# Altium PCB Crabit_V2.PcbDoc (part 2 of 2)
Units mil, origin at the board's own origin, x right, y up, seen from the top; angles counter-clockwise.
Board outline 1492.69 x 1472.87 mil, 4 copper layers (Top Layer, GND, PWR, Bottom Layer), stack 75.156 mil thick; 108 components, 88 nets, 475 pads, 227 vias.
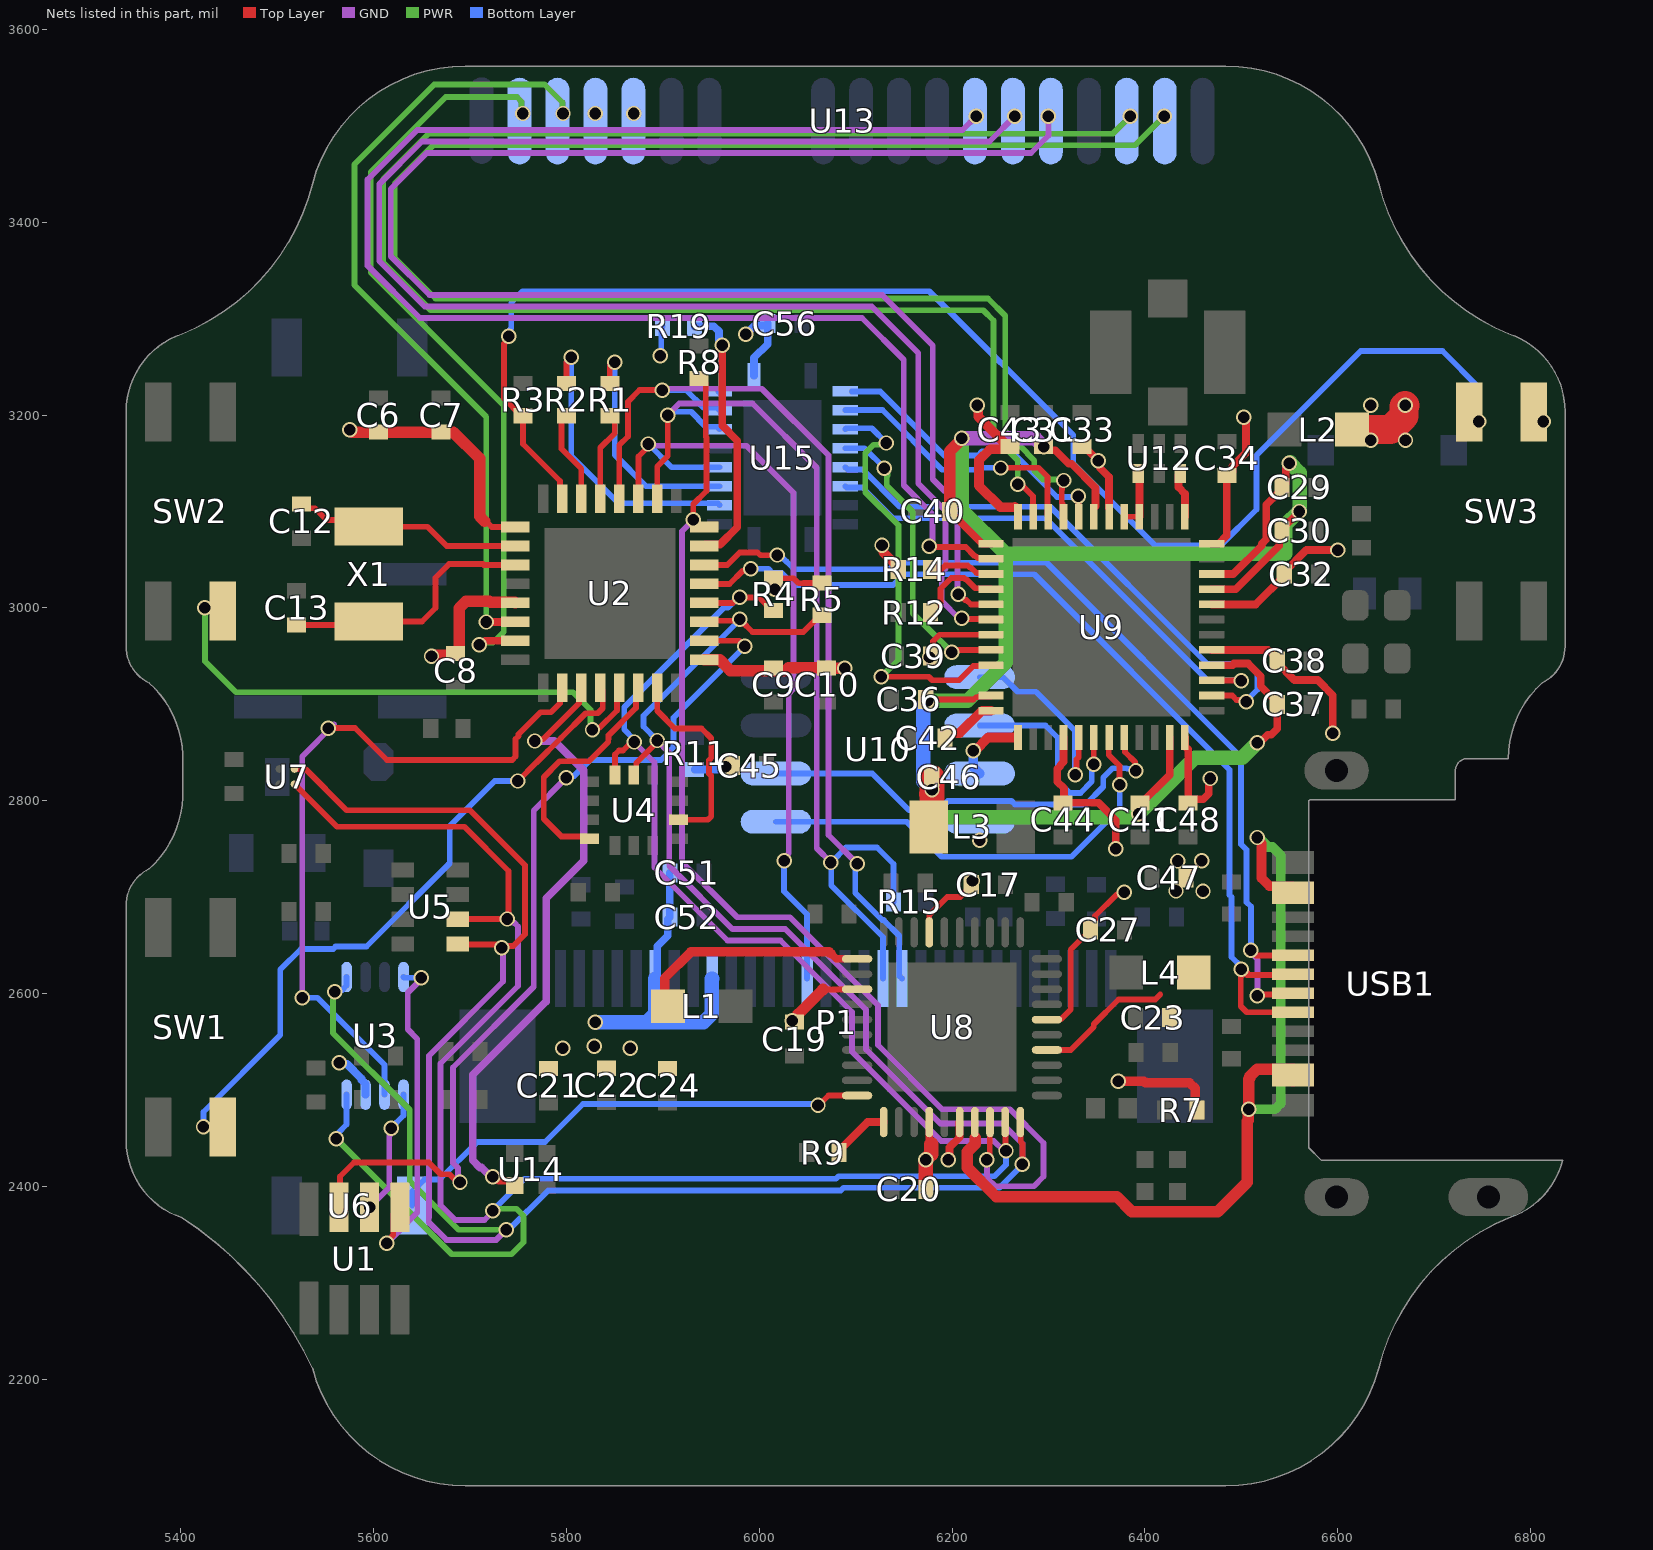
[diagram p4: the nets of this part, all layers, seen from the top]

## Via types
v1: diameter 16, hole 12, Top Layer to Bottom Layer, tented both sides, 224 vias
v2: diameter 16, hole 12, Top Layer to Bottom Layer, 3 vias

## Nets (pads, with @x,y where several pads share a name; then routed paths per layer and width w, separated by ;. In a path a pad name is that pad's centre, name@x,y a point inside that pad or via, vN(x,y) a via of type N, cw(c..) or ccw(c..) an arc to the next point about the centre after c; other vN are vias at no path point) (continued)
OLED_DC_IN: U9.33 U15.4 | length 451.2
  Top Layer w6: v1(6126.58,2928.56) 6175.84,2928.56 6179.4,2925 6207.33,2925 6221.99,2939.66 6239.56,2939.66 U9.33@6240.5,2940.6
  PWR w6: v1(6126.58,2928.56) 6144.33,2946.31 6144.33,3085.67 6110,3120 6110,3160.55 6118.6,3169.15 6130.06,3169.15 v1(6131.97,3171.07)
  Bottom Layer w6: U15.4@6089.25,3185.33 6090.22,3186.3 6116.73,3186.3 v1(6131.97,3171.07)
OLED_MOSI: P1.19 U2.28 U15.18 | length 991.5
  Top Layer w6: U2.28@5854.84,3113.03 5854.84,3168.88 5863.85,3177.89 5863.85,3213.85 5875.89,3225.89 v1(5899.28,3225.89)
  GND w6: v1(5899.28,3225.89) 5900.77,3227.38 6002.62,3227.38 6071.72,3158.28 6071.72,2764.33 v1(6101.59,2734.47)
  Bottom Layer w6: v1(5899.28,3225.89) 5924.02,3225.89 5942.38,3207.52 5956.22,3207.52 U15.18@5958.73,3205.01 ; v1(6101.59,2734.47) 6099.68,2732.55 6099.68,2704.13 6127.65,2676.16 6128.84,2676.16 6145.16,2659.84 6145.16,2618.32 P1.19@6148.06,2615.41
OLED_MOSI_IN: U9.20 U15.2 | length 305.8
  Top Layer w6: v1(6330.86,3115.85) 6331.13,3115.58 6331.13,3094.77 U9.20@6331.4,3094.5
  Bottom Layer w6: U15.2@6095.88,3224.44 6125.56,3224.44 6192,3158 6227.04,3158 6231.45,3162.41 6261.71,3162.41 6309,3115.11 6330.13,3115.11 v1(6330.86,3115.85)
OLED_RST: P1.14 U2.27 U15.15 | length 837.3
  Top Layer w6: U2.27@5874.53,3113.03 5874.77,3113.26 5874.77,3157.06 5885,3167.29 v1(5885,3170)
  GND w6: v1(5885,3170) 5886.76,3168.24 5986.76,3168.24 6035.67,3119.33 6035.67,2915.75 6030.52,2910.6 6030.52,2745.15 6025.81,2740.44 v1(6025.81,2737.73)
  Bottom Layer w6: v1@5887.71,3170 v1(5885,3170) 5909.04,3145.96 U15.15@5958.73,3145.96 ; v1(6025.81,2737.73) 6025.81,2706.11 6049.68,2682.24 P1.14@6049.68,2615.41
OLED_RST_IN: U9.32 U15.5 | length 313.5
  Top Layer w6: v1(6199.59,2954.08) 6202.3,2954.08 6204.61,2956.4 U9.32@6240.5,2956.4
  PWR w6: v1(6129.88,3145) 6129.88,3142.29 6133.09,3139.09 6133.09,3137.28 6132.29,3136.49 6132.29,3126.84 6159.35,3099.79 6159.35,2994.32 v1(6199.59,2954.08)
  Bottom Layer w6: U15.5@6089.25,3165.64 6109.24,3165.64 v1(6129.88,3145) v1@6129.88,3146.97
OLED_SCLK: P1.18 R15.1 U2.26 U15.17 | length 1015.9
  Top Layer w6: U2.26@5894.21,3113.03 5894.21,3146.75 5905,3157.54 v1(5905,3200)
  GND w6: v1(5905,3200) 5917.04,3212 5993,3212 6059.72,3145.28 6059.72,2750.55 v1(6074.39,2735.88)
  Bottom Layer w6: v1(5905,3200) 5907.71,3200 5911.22,3203.51 5929.42,3203.51 5936.64,3196.3 5936.64,3195.77 5944.57,3187.84 5956.22,3187.84 U15.17@5958.73,3185.33 ; v1@6074.74,2735.53 6074.74,2712.1 6128.39,2658.45 P1.18@6128.39,2615.41 ; v1@6075.42,2736.76 6090.13,2751.47 6122.06,2751.47 6139.25,2734.28 R15.1@6139.25,2695
OLED_SCLK_IN: U9.22 U15.3 | length 282.3
  Top Layer w6: v1(6250.66,3145.14) 6250.93,3145.41 6289.59,3145.41 6298.95,3136.05 6298.95,3095.45 U9.22@6299.9,3094.5
  Bottom Layer w6: U15.3@6089.25,3205.01 6089.38,3205.15 6127.76,3205.15 6189.65,3143.25 6227,3143.25 6229.16,3145.41 6250.39,3145.41 v1(6250.66,3145.14)
OSC32_IN: C12.2 U2.2 X1.2 | length 240
  Top Layer w6: C12.2@5525,3107.71 5529.35,3103.37 5539.1,3103.37 5551.23,3091.23 5587.99,3091.23 X1.2@5595.01,3084.22 5655.78,3084.22 5675.78,3064.22 U2.2@5746.97,3064.22
OSC32_OUT: C13.2 U2.3 X1.1 | length 271.9
  Top Layer w6: C13.2@5520,2982.29 5591.51,2982.29 X1.1@5595.01,2985.78 5595.14,2985.92 5650.28,2985.92 5664.17,2999.81 5664.17,3031.3 5678.24,3045.38 5713.39,3045.38 5714.23,3044.53 U2.3@5746.97,3044.53
PA13: U9.21 U13.A2 | length 1809.6
  Top Layer w6: U9.21@6315.6,3094.5 6314.65,3095.45 6314.65,3108.02 6313.86,3108.81 6313.86,3122.89 6314.13,3123.16 6314.13,3130.2 v1(6316.05,3132.11)
  PWR w6: v1(6316.05,3132.11) 6314.84,3133.32 6293.99,3133.32 6285.34,3141.97 6285.34,3152.9 6278,3160.25 6278,3160.53 6255.19,3183.34 6255.19,3303.07 6237.43,3320.82 5664.18,3320.82 5622,3363 5622,3440.03 5661.81,3479.84 6389.84,3479.84 v1(6420,3510)
PA15: U9.23 U13.A3 | length 1769.6
  Top Layer w6: v1(6268.18,3128.2) 6270.09,3126.29 6273.71,3126.29 6284.1,3115.9 U9.23@6284.1,3094.5
  PWR w6: v1(6268.18,3128.2) 6268.18,3153.1 6243.07,3178.2 6243.07,3298.22 6232.46,3308.82 5659.21,3308.82 5610,3358.03 5610,3445 5656.84,3491.84 6366.84,3491.84 v1(6385,3510)
PA25: U9.30 U13.A6 | length 1696.6
  Top Layer w6: v1(6210,2989.1) 6210.6,2988.5 6239.9,2988.5 U9.30@6240.5,2987.9
  GND w6: v1(6210,2989.1) 6207.29,2989.1 6189.32,3007.07 6189.32,3036.96 6193.35,3040.99 6193.35,3100.69 6165,3129.04 6165,3264.38 6116.71,3312.67 5652.96,3312.67 5605.76,3359.87 5605.76,3439.37 5650.23,3483.84 6238.84,3483.84 v1(6265,3510)
PA26: U9.29 U13.A5 | length 1703
  Top Layer w6: v1(6206.32,3014.12) 6207.58,3014.12 6213.39,3008.31 6214.83,3008.31 6219.54,3003.6 U9.29@6240.5,3003.6
  GND w6: v1(6206.32,3014.12) 6205.6,3014.84 6205.6,3107.79 6180,3133.39 6180,3272.23 6127.56,3324.67 5657.93,3324.67 5617.76,3364.84 5617.76,3434.4 5655.2,3471.84 6281.84,3471.84 6300,3490 v1(6300,3510)
PA27: U9.26 U13.A7 | length 1621.2
  Top Layer w6: v1(6176.35,3063.84) 6177.14,3063.05 6214.27,3063.05 6223.67,3053.65 6224.77,3053.65 6226.57,3051.85 6239.55,3051.85 U9.26@6240.5,3050.9
  GND w6: v1(6176.35,3063.84) 6176.35,3066.55 6179.73,3069.93 6179.73,3097.34 6149.87,3127.21 6149.87,3257.32 6106.51,3300.67 5647.99,3300.67 5593.76,3354.9 5593.76,3444.34 5645.26,3495.84 6210.84,3495.84 v1(6225,3510)
PA28: R12.2 U9.28 | length 91.1
  Top Layer w6: R12.2@6177.71,2995 6188,3005.28 6188,3019.84 6189.31,3021.15 6194.59,3026.43 6199.28,3031.12 6212.26,3031.12 6213.73,3029.65 6214.83,3029.65 6224.13,3020.35 6239.55,3020.35 U9.28@6240.5,3019.4
PA30: R14.2 U9.27 | length 68.8
  Top Layer w6: R14.2@6177.71,3040 6178.49,3039.22 6188.21,3039.22 6192.99,3044 6216.35,3044 6218.7,3041.65 6219.8,3041.65 6225.4,3036.05 6239.55,3036.05 U9.27@6240.5,3035.1
PAT_EN: U2.10 U3.6 | length 749.4
  Top Layer w6: v1(5552.71,2875.34) 5580.77,2875.34 5613.85,2842.27 5743.71,2842.27 5747.23,2845.78 5747.23,2863.87 5750.31,2866.95 5750.31,2868.94 5773.09,2891.72 5783.86,2891.72 5793.27,2901.13 5793.27,2914.46 U2.10@5795.78,2916.97
  GND w6: v1(5526,2595.51) 5526,2845.94 v1@5558.99,2878.93
  Bottom Layer w6: v1(5526,2595.51) 5541.81,2595.51 5611.3,2526.02 U3.6@5611.3,2495.07
PAT_INR: U1.7 U2.18 | length 946.7
  Top Layer w6: U1.7@5564.25,2378.15 5565,2378.9 5565,2410 5579.74,2424.74 5657.23,2424.74 5669.58,2412.39 5678.55,2412.39 5686.86,2404.08 v1(5689.56,2404.08) ; U2.18@5943.03,2965.79 5979.21,2965.79 v1(5985,2960)
  GND w6: v1(5689.56,2404.08) 5687.65,2405.99 5687.65,2418.69 5682.26,2424.08 5682.26,2523.24 5765.98,2606.97 5765.98,2789.91 v1(5799.9,2823.82)
  Bottom Layer w6: v1(5799.9,2823.82) 5801.81,2825.74 5808.11,2825.74 5824.66,2842.29 5898,2842.29 5911.06,2855.35 5911.06,2886.06 v1(5985,2960)
PAT_SCL: U1.5 U3.4 | length 359.8
  Top Layer w6: v1(5613.5,2341.01) 5613.5,2342.62 5620.4,2349.53 5620.4,2371.31 U1.5@5627.24,2378.15
  GND w6: v1(5613.5,2341.01) 5645.3,2372.81 5645.3,2552.84 5635.37,2562.77 5635.37,2600.72 5649.33,2614.67 v1(5649.33,2616.27)
  Bottom Layer w6: U3.4@5630.99,2617.11 5631.84,2616.27 v1(5649.33,2616.27)
PAT_SDA: U1.6 U3.5 | length 131.5
  GND w6: v1(5595.74,2378.15) 5616.29,2398.69 5616.29,2451.86 5616.46,2452.03 5616.46,2458.47 v1(5618.37,2460.38)
  Bottom Layer w6: v1(5618.37,2460.38) 5618.37,2460.71 5630.99,2473.33 U3.5@5630.99,2495.07
PMIC_IRQ: R8.2 U2.24 U8.38 | length 1214.8
  Top Layer w6: v1(5931.64,3091.45) 5931.64,3107.55 5945.21,3121.12 5945.21,3176.84 5944.55,3177.5 5944.55,3233.22 5939.68,3238.09 R8.2@5937.71,3238.09 ; v1@5931.72,3091.37 5931.64,3091.29 5931.64,3086.41 5934.15,3083.9 U2.24@5943.03,3083.9 ; v1(6235.86,2427.45) 6235.86,2430.15 6239.01,2433.3 6239.01,2466.22 U8.38@6239.37,2466.58
  GND w6: v1(5931.64,3091.45) 5931.64,3091.14 5920,3079.5 5920,2736.08 5977.08,2678.99 6031.94,2678.99 6123.11,2587.82 6123.11,2546.62 6189.72,2480 6260,2480 6295,2445 6295,2410 6285,2400 6245,2400 6236.32,2408.68 6236.32,2426.98 v1(6235.86,2427.45)
PMIC_PWRON: U6.2 U8.30 | length 518.3
  Top Layer w6: v1(6060.93,2484.07) 6061.78,2484.07 6071.84,2494.13 U8.30@6101.57,2494.13
  Bottom Layer w6: U6.2@5639.98,2380 5639.98,2394.25 5652.73,2407 5668.44,2407 5707.44,2446 5777.82,2446 5817.22,2485.41 6059.59,2485.41 v1(6060.93,2484.07)
PMIC_SCK: R5.2 U2.19 U3.1 U4.13 U5.4 U7.A2 U8.40 | length 2830.4
  Top Layer w6: U7.A2@5517.87,2832.87 5518.23,2832.51 5529.46,2832.51 5571.97,2790 5700,2790 5757,2733 5757,2661.46 5744.72,2649.18 v1@5736.17,2649.18 ; U5.4@5693.67,2650.9 5726.61,2650.9 5730.15,2647.36 v1@5734.23,2647.36 ; U4.13@5870,2826.42 5872.51,2828.93 5872.51,2839.16 5894.06,2860.71 v1(5894.06,2862.39) ; U2.19@5943.03,2985.47 5944.3,2986.74 5979.3,2986.74 5980,2986.03 5981.97,2986.03 5993,2975 6045.74,2975 R5.2@6063.03,2992.29 ; U8.40@6270.87,2466.58 6271.23,2466.22 6271.23,2445.81 6273.01,2444.03 v1(6273.01,2422.94)
  GND w6: v1(5732.86,2647.36) 5734.23,2645.99 5734.23,2612.39 5657.3,2535.47 5657.3,2367.84 5657.22,2367.76 5657.22,2362.78 5675.6,2344.4 5727.09,2344.4 v1(5737.49,2354.8) ; v1(5894.06,2862.39) 5906.65,2849.8 5906.65,2732.45 5972.11,2666.99 6026.97,2666.99 6110.73,2583.23 6110.73,2542.03 6187.75,2465 6252.04,2465 6273.01,2444.03 v1(6273.01,2422.94)
  PWR w6: v1(5559.61,2601.75) 5557.7,2599.84 5557.7,2558.98 5637.35,2479.32 5637.35,2405.53 5688.08,2354.8 v1(5737.49,2354.8)
  Bottom Layer w6: v1(5559.61,2601.75) 5561.52,2603.67 5567.37,2603.67 5571.93,2608.23 U3.1@5571.93,2617.11 ; v1(5737.49,2354.8) 5740.2,2354.8 5781.08,2395.69 6084.53,2395.69 6087.29,2398.45 6249.14,2398.45 6273.01,2422.32 v1(6273.01,2422.94) ; v1(5894.06,2862.39) 5894.06,2862.8 5880,2876.86 5880,2888 v1(5980,2988)
PMIC_SDA: R4.2 U2.20 U3.8 U4.14 U5.3 U7.B2 U8.39 | length 2694.6
  Top Layer w6: U7.B2@5517.87,2817.13 5562.07,2772.93 5694.24,2772.93 5740,2727.17 5740,2680 v1@5738.5,2678.5 ; U5.3@5689.11,2677.13 5738.45,2677.13 v1(5738.58,2677.27) ; U4.14@5850.32,2826.42 5850.32,2847.78 5854.56,2852.03 5858.63,2852.03 5867.49,2860.89 v1(5870.19,2860.89) ; U2.20@5943.03,3005.16 5972.45,3005.16 5978.29,3011 v1(5980,3011) ; v1@5980.65,3010.65 5999.67,3010.65 6013.03,2997.29 R4.2@6015,2997.29 ; U8.39@6255.12,2466.58 6255.48,2466.22 6255.48,2437.52 v1(6256.01,2436.98)
  GND w6: v1(5723.56,2374.77) 5723.56,2373.49 5715.05,2364.98 5685.02,2364.98 5669.3,2380.7 5669.3,2527.26 5749.86,2607.81 5749.86,2669.47 5746.34,2672.98 5745.57,2672.98 5741.29,2677.27 v1(5738.58,2677.27) ; v1(5870.19,2860.89) 5891.46,2839.62 5891.46,2730.67 5967.14,2654.99 6022,2654.99 6096.29,2580.7 6096.29,2539.49 6188.78,2447 6243.29,2447 6253.31,2436.98 v1(6256.01,2436.98)
  PWR w6: v1(5561.2,2449.28) 5681.05,2329.43 5743,2329.43 5755.41,2341.83 5755.41,2369.39 5748.17,2376.63 5725.42,2376.63 v1(5723.56,2374.77)
  Bottom Layer w6: v1@5564,2456.05 5571.93,2463.99 U3.8@5571.93,2495.07 ; v1(5723.56,2374.77) 5756.48,2407.69 6079.56,2407.69 6082.31,2410.45 6244.17,2410.45 6256.01,2422.29 v1(6256.01,2436.98) ; v1(5870.19,2860.89) 5870.19,2863.59 5859.92,2873.87 5859.92,2896.89 5963.13,3000.1 5967.39,3000.1 5978.29,3011 v1(5980,3011)
QMI_INR1: U2.15 U4.9 | length 209.8
  Top Layer w6: U2.15@5894.21,2916.97 5894.21,2893.21 5912.42,2875 5940,2875 5950.16,2864.84 5950.16,2844.2 5948,2842.04 5948,2827.96 5950.16,2825.8 5950.16,2783.67 5946.65,2780.16 U4.9@5916.26,2780.16
QMI_INR2: U2.14 U4.4 | length 250.3
  Top Layer w6: U4.4@5823.74,2760.47 5821.23,2762.98 5794.6,2762.98 5776.36,2781.22 5776.36,2824.33 5792.86,2840.82 5823.45,2840.82 5843.37,2860.74 5843.37,2863.79 5843.77,2864.19 5843.77,2867.98 5872.01,2896.22 5872.01,2914.46 U2.14@5874.52,2916.97
RF_2.4G: U9.16 U9.17 U12.4 | length 61.1
  Top Layer w6: U9.17@6378.6,3094.5 U9.16@6394.4,3094.5
  Top Layer w8: U12.4@6393.3,3139.3 6394.4,3138.2 U9.16@6394.4,3094.5
RF_5.2G: U9.13 U12.6 | length 48.2
  Top Layer w8: U12.6@6436.7,3139.3 6435,3137.6 6435,3125 6441.6,3118.4 U9.13@6441.6,3094.5
RXD: R1.2 U15.14 | length 243.6
  Top Layer w6: R1.2@5845,3232.71 5845,3251.49 5848.52,3255 v1(5850,3255)
  Bottom Layer w6: v1(5850,3255) 5850,3158.84 5882.57,3126.27 U15.14@5958.73,3126.27
RXD_IN: U9.2 U15.6 | length 588.7
  Top Layer w6: U9.2@6469.5,2909.1 6490.62,2909.1 6495.19,2904.53 6503.11,2904.53 v1(6505.02,2902.62)
  Bottom Layer w6: U15.6@6089.25,3145.96 6091.76,3143.45 6107.38,3143.45 6145.83,3105 6301.97,3105 6465.07,2941.9 6506.94,2941.9 6516.9,2931.94 6516.9,2915.34 6505.02,2903.46 v1(6505.02,2902.62)
SPI_CLK: U9.42 U10.6 | length 223.2
  Top Layer w6: v1(6346.89,2837.95) 6347,2838.05 6347,2865.4 U9.42@6347.1,2865.5
  Bottom Layer w6: U10.6@6228.66,2878.12 6296.88,2878.12 6310,2865 6310,2820 6322,2808 6333.16,2808 6344.92,2819.77 6344.92,2828.91 6344.98,2828.97 6344.98,2836.04 v1(6346.89,2837.95)
SPI_CS: U9.43 U10.1 | length 470.6
  Top Layer w6: U9.43@6362.9,2865.5 6362.59,2865.19 6362.59,2847.41 6373.8,2836.21 6373.8,2816.7 v1(6373.92,2816.57)
  Bottom Layer w6: U10.1@6017.46,2778.12 6153.14,2778.12 6189.38,2741.87 6323.82,2741.87 6373.92,2791.98 v1(6373.92,2816.57)
SPI_DATA: U9.41 U10.5 | length 207.9
  Top Layer w6: v1(6327.92,2826.81) 6329.2,2828.08 6329.2,2842.95 6331.4,2845.15 U9.41@6331.4,2865.5
  Bottom Layer w6: U10.5@6228.66,2928.12 6252.96,2928.12 6268.09,2912.99 6287.01,2912.99 6327.29,2872.71 6327.29,2827.45 v1(6327.92,2826.81)
SPI_DATA1: U9.44 U10.2 | length 456
  Top Layer w6: U9.44@6378.6,2865.5 6379.55,2864.55 6379.55,2850.57 6390.14,2839.98 6390.14,2831.91 v1(6390.8,2831.26)
  Bottom Layer w6: U10.2@6017.46,2828.12 6117.34,2828.12 6155.34,2790.12 6158.11,2790.12 6158.31,2789.92 6185.9,2789.92 6195.5,2799.52 6261.83,2799.52 6265.35,2796 6338.48,2796 6356.92,2814.45 6356.92,2823.94 6366.55,2833.57 6380.97,2833.57 6381.36,2833.17 6388.88,2833.17 v1(6390.8,2831.26)
ST/BOOT0: R3.1 SW3.2 U2.31 | length 1535.3
  Top Layer w6: v1(5740,3281.6) 5740,3278.89 5735.18,3274.07 5735.18,3217.1 5753.03,3199.25 R3.1@5755,3199.25 5755,3170 5793.28,3131.72 5793.28,3115.54 U2.31@5795.79,3113.03
  Bottom Layer w6: v1(5740,3281.6) 5741.91,3283.51 5741.91,3289.31 5742.72,3290.11 5742.72,3316.65 5754.5,3328.44 6176.47,3328.44 6325.69,3179.21 6325.69,3149.76 6410.6,3064.86 6478.7,3064.86 6515.97,3102.13 6515.97,3158.37 6623.95,3266.35 6708.65,3266.35 6746.54,3228.46 v1(6746.54,3193.35)
ST_PA0: U2.6 U13.A16 | length 830
  Top Layer w8: v1(5716.71,2985.38) 5716.76,2985.43 5746.92,2985.43 U2.6@5746.97,2985.48
  PWR w6: v1(5716.71,2985.38) 5716.85,2985.52 5716.85,3198.15 5580,3335 5580,3460 5662.88,3542.88 5777.12,3542.88 5795.78,3524.22 5795.78,3514.71 v1@5796.45,3514.04
  other v1: 5796.45,3512.84
ST_PA1: U2.7 U13.A17 | length 807.1
  Top Layer w8: v1(5709.76,2961.86) 5711.93,2961.86 5715.86,2965.79 U2.7@5746.97,2965.79
  PWR w6: v1(5709.76,2961.86) 5711.68,2963.77 5723.77,2963.77 5735,2975 5735,3210 5597,3348 5597,3452 5674.84,3529.84 5748.72,3529.84 5753.42,3525.14 5753.42,3514.19 v1(5754.77,3512.84)
ST_RX: R2.1 U2.30 | length 96.8
  Top Layer w6: R2.1@5800,3199.25 5799.87,3199.25 5795,3194.37 5795,3165 5815.47,3144.53 U2.30@5815.47,3113.03
ST_TX: R1.1 U2.29 | length 94.5
  Top Layer w6: U2.29@5835.16,3113.03 5835.16,3166.17 5850,3181.01 5850,3194.37 5845.13,3199.25 R1.1@5845,3199.25
STM_USB_M: U2.21 USB1.A7 USB1.B7 | length 1018.8
  Top Layer w6: U2.21@5943.03,3024.84 5969.13,3024.84 5982.88,3038.59 5989.37,3038.59 v1(5991.28,3040.5) ; v1@6506.75,2620.96 v1@6505.12,2622.59 ; USB1.B7@6553.62,2580.47 6505.72,2580.47 6499.52,2586.67 6499.52,2616.98 v1@6503.77,2621.23 ; USB1.A7@6553.62,2619.84 6552.83,2619.05 6505.95,2619.05 v1@6503.77,2621.23 ; v1@6503.77,2621.23 v1(6500,2625) 6502.71,2625 v1@6505.12,2622.59 ; v1@6503.77,2621.23 v1@6505.12,2622.59
  Bottom Layer w6: v1(5991.28,3040.5) 6009.5,3040.5 6013.84,3036.16 6023.33,3036.16 6035.84,3023.66 6138.66,3023.66 6149.84,3034.84 6285.16,3034.84 6487.82,2832.18 6487.82,2702.18 6490,2700 6490,2637.71 6500,2627.71 v1(6500,2625)
STM_USB_P: U2.22 USB1.A6 USB1.B6 | length 999.2
  Top Layer w6: U2.22@5943.03,3044.53 5966.82,3044.53 5979.8,3057.5 5998.32,3057.5 6001.29,3054.54 6018.39,3054.54 v1(6018.67,3054.82) ; v1(6510,2645) 6515.47,2639.53 USB1.B6@6553.62,2639.53 USB1.B6@6556.53,2636.62 ; v1(6516.52,2597.47) 6517.86,2598.82 6552.27,2598.82 USB1.A6@6553.62,2600.16
  GND w6: v1(6510,2645) 6510,2642.29 6517,2635.29 6517,2597.95 v1(6516.52,2597.47)
  Bottom Layer w6: v1(6018.67,3054.82) 6021.37,3054.82 6028.03,3048.16 6028.3,3048.16 6036.46,3040 6135,3040 6141.84,3046.84 6298.16,3046.84 6499.82,2845.18 6499.82,2754.75 6505.59,2748.98 6505.59,2694.73 6510,2690.32 v1(6510,2645)
SW_2: SW1.2 U2.12 | length 687.8
  Top Layer w6: v1(5749.68,2820.39) 5768.55,2839.26 5768.7,2839.26 5794.33,2864.88 5794.33,2865.04 5819.95,2890.66 5832.42,2890.66 5837.66,2895.9 5837.66,2914.46 U2.12@5835.15,2916.97
  Bottom Layer w6: v1(5423.46,2461.65) 5423.46,2477.17 5503.16,2556.88 5503.16,2624.77 5524.55,2646.15 5558.02,2646.15 5560.57,2648.71 5592.68,2648.71 5678.96,2734.99 5678.96,2773.73 5725.62,2820.39 v1(5749.68,2820.39)
SW_3: SW2.2 U2.13 | length 555.7
  Top Layer w6: v1(5826.99,2873.66) 5828.91,2875.57 5834.3,2875.57 5852.33,2893.6 5852.33,2914.46 U2.13@5854.84,2916.97
  PWR w6: v1(5425,3000) 5425,2944.66 5457.11,2912.55 5806.82,2912.55 5825,2894.36 5825,2883.37 5825.08,2883.29 5825.08,2875.57 v1(5826.99,2873.66)
SWATCH_EN: R19.2 U2.23 U15.19 | length 332.1
  Top Layer w8: U2.23@5943.03,3064.21 5944.54,3065.72 5959.27,3065.72 5977.31,3083.77 5977.31,3173.42 5961.55,3189.18 v1(5961.55,3272.46)
  Bottom Layer w8: R19.2@5933,3291.96 5933.29,3292.25 5952.87,3292.25 5958.21,3286.92 5958.21,3277.96 5961.55,3274.62 v1(5961.55,3272.46) ; v1@5958.21,3272.46 5961.55,3269.12 5961.55,3226.21 5960.04,3224.7 U15.19@5958.73,3224.7
TS: R9.2 U8.31 | length 60.6
  Top Layer w8: R9.2@6082.71,2435 6082.71,2436.97 6112.33,2466.58 U8.31@6129.13,2466.58
TXD/BOOT: R2.2 U15.13 | length 306.7
  Top Layer w6: R2.2@5800,3232.71 5800,3255 v1(5805,3260)
  Bottom Layer w6: v1(5805,3260) 5805,3157.46 5854.01,3108.45 5956.87,3108.45 U15.13@5958.73,3106.59
TXD/BOOT_IN: U9.3 U15.7 | length 525
  Top Layer w6: U9.3@6469.5,2924.9 6469.85,2924.55 6499.55,2924.55 v1(6499.9,2924.21)
  Bottom Layer w6: U15.7@6089.25,3126.27 6090.76,3124.76 6107.07,3124.76 6138.83,3093 6297,3093 6465.1,2924.9 6499.21,2924.9 v1(6499.9,2924.21)
VBUS: U8.37 USB1.A4 USB1.A9 USB1.B4 USB1.B9 | length 944.4
  Top Layer w10: v1(6516.82,2761.8) 6516.82,2760.17 6521.44,2755.55 6521.44,2752.83 6520.97,2752.35 6520.97,2719.62 6529.29,2711.3 6552.71,2711.3 USB1.A9@6553.62,2710.39 USB1.B4@6553.62,2698.58
  Top Layer w12: 6224.01,2450.51 6224.01,2443.88 6215.86,2435.73 6215.86,2419.16 6245.68,2389.34 6370.7,2389.34 6386.44,2373.6 6475.66,2373.6 6506.16,2404.11 6506.16,2467.28 6507.17,2468.28 6507.17,2479.1 v1(6507.93,2479.86) 6507.93,2510.9 6508.89,2511.86 6508.89,2513.89 6516.42,2521.42 USB1.B9@6553.62,2521.42 USB1.A4@6553.62,2509.61
  PWR w10: v1(6507.93,2479.86) 6534.99,2479.86 6540.85,2485.72 6540.85,2743.53 6532.43,2751.95 6528.28,2751.95 6518.44,2761.8 v1(6516.82,2761.8)
VCC_1V1: C29.2 C30.2 C31.2 C36.1 C37.1 C40.1 C41.1 C46.1 L3.1 U9.4 U9.9 U9.10 U9.19 U9.25 U9.35 U9.47 | length 2211.8
  Top Layer w6: C36.1@6174.99,2906.5 v1(6174.99,2903.73) 6176.42,2903.73 6177.59,2904.9 6222.22,2904.9 6224.72,2907.4 6226.89,2907.4 6227.64,2908.15 6239.55,2908.15 U9.35@6240.5,2909.1
  Top Layer w8: C40.1@6197.72,3098.03 6201.59,3094.16 6203.89,3094.16 6231.45,3066.6 U9.25@6240.5,3066.6 ; v1(6295,3167.29) 6298.87,3163.41 6307.01,3163.41 6321.01,3149.41 6324.2,3149.41 6348.86,3124.75 6348.86,3105.31 U9.19@6347.15,3103.6 ; v1(6393.65,2786.47) 6394.33,2787.14 6394.33,2795.07 6425.9,2826.65 U9.47@6425.9,2865.5 ; U9.4@6469.5,2940.6 6490.84,2940.6 6492.44,2942.21 6507.36,2942.21 6520.38,2929.18 6520.38,2918.87 6537.28,2901.97 6537.28,2874.69 6531.02,2868.43 6527.41,2868.43 6518.98,2860 v1(6516.82,2860) ; U9.9@6469.5,3019.4 6494.4,3019.4 6539.3,3064.3 6539.3,3077.02 C30.2@6542.29,3080 6542.29,3081.97 6560,3099.69 v1(6560,3100) ; U9.10@6469.5,3035.1 6491.82,3035.1 6521.28,3064.56 6521.28,3066.28 6526.07,3071.07 6526.07,3106.82 6538.41,3119.16 6542.29,3123.03 C29.2@6542.29,3125 6546.16,3128.88 6546.16,3146.16 v1(6550,3150)
  Top Layer w12: C40.1@6197.72,3098.03 6197.72,3162.36 6210.18,3174.82 v1(6210.18,3175.91)
  Top Layer w26: L3.1@6176.01,2772.7 6179.18,2775.88 v1@6179.18,2807.17 ; v1@6178.93,2806.92 v1@6179.18,2807.17 ; C46.1@6178.93,2824.54 6178.93,2819.46 6179.18,2819.2 v1(6179.18,2811.3) v1@6179.18,2807.17
  GND w15: v1(6210.18,3175.91) 6286.11,3175.91 6294.73,3167.29 v1(6295,3167.29)
  PWR w15: v1(6174.99,2903.73) 6216.06,2903.73 6255.66,2943.32 6255.66,3056.04 ; v1(6179.18,2811.3) 6178.09,2810.21 6178.09,2792.95 6188.16,2782.89 6388.67,2782.89 6392.05,2786.28 6393.46,2786.28 v1(6393.65,2786.47) 6451.66,2844.48 6501.03,2844.48 6516.55,2860 v1(6516.82,2860) ; v1(6210.18,3175.91) 6210.18,3101.52 6255.66,3056.04 ; v1@6550.66,3151.04 6550.66,3149.96 6560.66,3139.96 6560.66,3101.04 6545.66,3086.04 6545.66,3056.04 6255.66,3056.04
  Bottom Layer w15: v1(6174.99,2903.73) 6174.99,2903.46 6170.22,2898.68 6170.22,2820.09 6179.01,2811.3 v1(6179.18,2811.3)
VCC_1V8: C42.1 U9.36 | length 52.6
  Top Layer w10: C42.1@6197.59,2870 6207.95,2870 6231.35,2893.4 U9.36@6240.5,2893.4
VCC_3V3: C6.2 C7.2 C8.2 C9.2 C10.2 C21.1 C22.1 C24.1 C51.1 C52.2 C56.2 L1.2 P1.6 P1.9 R4.1 R5.1 R19.1 SW3.4 U2.1 U2.5 U2.17 U3.7 U8.21 U13.A14 U13.A15 U15.20 | length 1312.2
  Top Layer w6: 5715,3090 5716.4,3090 5722.5,3083.9 U2.1@5746.97,3083.9 ; R4.1@6015,3030.75 6035.5,3030.75 6040.75,3025.5 6045.9,3025.5 6046.15,3025.75 R5.1@6065,3025.75
  Top Layer w8: 6074.62,2641.08 6079.76,2635.93 U8.21@6089.83,2635.93
  Top Layer w10: L1.2@5901.8,2589.25 5901.8,2615.8 5929.13,2643.14 6072.56,2643.14 6074.62,2641.08
  Top Layer w12: v1(5575,3185) 5577.71,3182.29 C6.2@5605,3182.29 C7.2@5670,3182.29 5682.71,3182.29 5710,3155 5710,3095 5715,3090 ; v1(5660,2950) 5661.08,2950 5661.92,2950.84 5683.13,2950.84 C8.2@5685,2952.71 5686.88,2952.71 5688.75,2954.59 5688.75,2999.83 5695.78,3006.86 5720.11,3006.86 5721.32,3005.65 5746.48,3005.65 U2.5@5746.97,3005.16 ; U2.17@5943.03,2946.1 5958.9,2946.1 5970,2935 6010.32,2935 6011.16,2935.84 C9.2@6015,2935.84 ; C9.2@6015,2935 6027.66,2935 6030.37,2937.71 C10.2@6070,2937.71 6070.2,2937.52 6088.53,2937.52 v1(6088.72,2937.32)
  Bottom Layer w6: v1(5897.34,3261.65) 5898.44,3262.75 5898.44,3290.86 R19.1@5899.53,3291.96
  Bottom Layer w8: v1(5564.3,2528.33) 5565.83,2526.8 5572.38,2526.8 5587.45,2511.73 5587.45,2510.3 5591.62,2506.13 U3.7@5591.62,2495.07 ; P1.6@5892.19,2615.41 5894.1,2617.32 5894.1,2649.1 5905,2660 5905,2676.97 C52.2@5907.29,2679.26 C51.1@5907.28,2725 ; v1(5986.22,3283.67) 5995.42,3292.88 6008.73,3292.88 C56.2@6008.78,3292.93 ; U15.20@5994.46,3240.74 5994.46,3259.33 6008.78,3273.66 C56.2@6008.78,3292.93 ; C56.2@6008.78,3294.9 C56.2@6008.78,3292.93
  Bottom Layer w15: v1(5830,2570) 5883.41,2570 ; P1.6@5892.19,2615.41 5892.19,2578.79 5883.41,2570 ; P1.9@5951.24,2615.41 5950.97,2615.14 5950.97,2578.79 5942.18,2570 5883.41,2570
  other v1: 5795.99,2542.96 5866.22,2543.16 5828.88,2545.34 6016.29,3019.16 6813.46,3193.35 5830,3512.84 5870,3512.84
VCCR_3V3: C23.2 C32.2 C33.2 C34.2 C38.1 C39.1 C43.1 C44.1 C45.1 C47.1 C48.1 L2.2 L4.1 R11.1 R14.1 U8.4 U9.5 U9.8 U9.12 U9.18 U9.24 U9.31 U9.37 U9.40 U9.48 U10.7 U10.8 | length 1468.9
  Top Layer w6: v1(6176.64,2948.92) C39.1@6177.72,2950 6180.33,2952.61 6180.33,2965.33 6187.1,2972.1 U9.31@6240.5,2972.1 ; U8.4@6298.43,2541.38 6323.17,2541.38 6347.06,2565.27 6347.06,2568.11 6372.67,2593.71 6410.88,2593.71 6416.09,2598.93
  Top Layer w8: U9.24@6264.97,3104.68 6266.05,3103.6 6268.35,3103.6 6268.4,3103.55 U9.24@6268.4,3094.5 ; U9.40@6315.6,2865.5 6315.6,2840.25 6313.85,2838.5 6313.85,2838.19 6312.35,2836.69 6312.35,2835.83 6309.29,2832.77 6309.29,2819.83 6316.21,2812.9 6316.21,2798.93 C44.1@6315,2797.72 6351.94,2797.72 6369.96,2779.69 v1(6369.96,2750.04) ; C33.2@6335,3167.29 6336.97,3167.29 6353.17,3151.08 6353.17,3145.42 6362.9,3135.69 U9.18@6362.9,3103.6 ; U9.48@6441.6,2865.5 6441.6,2856.45 6445,2853.05 C48.1@6445,2797.72 6448.87,2801.59 6455.53,2801.59 6460.68,2801.59 6466.45,2807.36 6466.45,2821.45 v1(6467.98,2822.98) ; U9.5@6469.5,2956.4 6527.85,2956.4 6537.28,2946.97 6537.28,2943.03 6555.16,2925.15 6579.41,2925.15 6595.07,2909.5 6595.07,2890.61 6595,2890.54 v1(6595,2870) ; U9.8@6469.5,3003.6 6515.14,3003.6 6544.57,3033.03 C32.2@6544.57,3035 6544.57,3036.97 6567.6,3060 v1(6600,3060) ; U9.12@6469.5,3066.6 6476.55,3066.6 6485,3075.05 C34.2@6485,3137.29 6486.97,3137.29 6490.84,3141.16 6490.84,3146.7 6504.84,3160.7 6504.84,3195.16 v1@6500,3200
  Top Layer w10: v1(6127.33,3065) 6128.48,3063.85 6128.48,3057.74 6141.37,3044.84 6141.37,3042.87 R14.1@6144.25,3040 ; v1(6222.02,2851.72) 6223.64,2851.72 6237.42,2865.5 U9.37@6267.35,2865.5 ; v1(6226.07,3210) 6227.22,3208.85 6227.22,3198.1 C43.1@6258.03,3167.28 ; C43.1@6260,3167.28 6257.13,3164.41 6239.13,3164.41 6228,3153.28 6228,3126.54 6250.13,3104.41 6264.69,3104.41 U9.24@6264.97,3104.68
  Top Layer w30: L2.2@6615,3185 6655,3185 6668.86,3198.86 6668.86,3208.86 v1(6670,3210)
  Bottom Layer w8: R11.1@5933.06,2832.37 5962.37,2832.37 v1(5965,2835)
  Bottom Layer w10: v1(6222.02,2851.72) 6222.02,2834.77 U10.7@6228.66,2828.12
  other v1: 6432.3,2706.32 6460.37,2706.18 6433.97,2737.45 6459.26,2737.86 6228.92,2758.87 6351.64,3152.61 6634.45,3174.11 6670.4,3173.82 6502.42,3197.58 6634.45,3210
VSYS: C17.2 C19.1 C20.1 C27.1 R7.1 U8.6 U8.17 U8.23 U8.34 U8.36 | length 566.9
  Top Layer w6: 6066.12,2604.12 6101.32,2604.12 U8.23@6101.57,2604.37 ; U8.17@6176.38,2663.43 6176.4,2681.52 6195.05,2700.18 6208.63,2700.18 6214.4,2705.96 6215.08,2705.96 6219.95,2710.83 6219.95,2715.78 v1(6221.25,2717.08) ; U8.6@6298.43,2572.87 6298.78,2573.23 6313.14,2573.23 6323.17,2583.26 6323.17,2645.59 C27.1@6343.56,2665.97 ; C27.1@6343.56,2663.99 6342.57,2664.98 6348.43,2670.84 6348.43,2680.29 6371.15,2703.01 6376.55,2703.01 v1(6378.46,2704.93)
  Top Layer w8: U8.34@6176.38,2466.58 6176.44,2466.52 6176.44,2444.96 6177.78,2443.62 ; v1(6195.86,2427.45) 6197.39,2428.98 6197.39,2440.32 6207.81,2450.74 6207.81,2466.52 U8.36@6207.87,2466.58
  Top Layer w10: v1(6372.54,2508.8) 6399.07,2508.8 6400.54,2507.34 6446.56,2507.34 6452.42,2501.48 6452.42,2480.63 R7.1@6453.96,2479.09
  Top Layer w12: v1(6034.29,2571.88) 6039.77,2571.88 6040.22,2572.33 6040.22,2578.22 6066.12,2604.12
  Top Layer w15: v1(6172.88,2427.45) v1(6172.88,2427.45) 6172.93,2396.85 C20.1@6172.98,2396.8 ; v1@6173.07,2427.45 6173.07,2427.91 6178.21,2433.04 6178.21,2443.62
WS2812: U2.11 U14.4 | length 640.1
  Top Layer w6: v1(5767.31,2861.9) 5769.22,2863.81 5775.63,2863.81 5812.96,2901.14 5812.96,2914.46 U2.11@5815.47,2916.97
  Top Layer w8: v1@5730.11,2405.58 5741.5,2405.58 U14.4@5746.35,2400.72
  GND w8: v1(5723.56,2409.96) 5721.4,2409.96 5711.98,2419.38 5710.36,2419.38 5702.81,2426.92 5702.81,2515.57 5778.98,2591.75 5778.98,2698.67 5817.9,2737.59 5817.9,2831.28 5787.31,2861.87 v1(5767.31,2861.9)
pads on no net: Buzzle1.3 CN1.3 CN1.4 P1.31 P1.32 RF1.1 SW1.1 SW1.3 SW2.1 SW2.3 SW3.1 SW3.3 U4.1 U4.10 U4.11 U8.7 U8.8 U8.9 U8.10 U8.11 U8.12 U8.13 U8.14 U8.15 U8.20 U8.24 U8.25 U8.26 U8.27 U8.28 U8.29 U8.32 U8.35 U9.14 U9.34 U9.45 U9.46 U13.A4 U13.A8 U15.1 U15.11 U15.12 U16.1 USB1.A8 USB1.B8

## Polygon pours and split planes (outlines as drawn)
GND on Top Layer "NONET_L04_P-001" (hatched Horizontal grid 0 track 6, remove dead copper, pour order 22): 5343.22,2447.72 ccw(c5428.01,2447.72) 5401.41,2367.21 cw(c5195.5,2052.43) 5536.59,2211 ccw(c5695.28,2253.52) 5695.28,2089.23 6483.85,2089.23 ccw(c6483.85,2253.52) 6642.54,2211 cw(c6863.72,2156.19) 6777.72,2367.21 ccw(c6751.13,2447.72) 6835.91,2447.72 6835.91,2691.2 ccw(c6793.66,2691.2) 6812.05,2729.24 cw(c6882.14,2807.31) 6777.32,2811.97 6777.32,2839.37 cw(c6882.14,2844.02) 6812.05,2922.1 ccw(c6793.66,2960.13) 6835.91,2960.13 6835.91,3203.62 ccw(c6751.13,3203.62) 6777.72,3284.12 cw(c6863.72,3495.14) 6642.54,3440.34 ccw(c6483.85,3397.82) 6483.85,3562.1 5695.28,3562.1 ccw(c5695.28,3397.82) 5536.59,3440.34 cw(c5315.41,3495.14) 5401.41,3284.12 ccw(c5428.01,3203.62) 5343.22,3203.62 5343.22,2960.13 ccw(c5385.47,2960.13) 5367.08,2922.1 cw(c5296.99,2844.02) 5401.81,2839.37 5401.81,2811.97 cw(c5296.99,2807.31) 5367.08,2729.24 ccw(c5385.48,2691.2) 5343.22,2691.2
NetL4_2 on Top Layer "NONET_L04_P-001" (hatched Horizontal grid 0 track 8, pour order 18): 6350.55,2679.72 6356.33,2685.5 6385.4,2685.5 6393.51,2677.39 6393.51,2623.33 6333.96,2563.78 6333.96,2561.69 6321.62,2549.35 6307.42,2549.35 6300.02,2556.75 6300.02,2632.35 6329.33,2661.66 6350.55,2661.66
NetL1_1 on Top Layer "NONET_L04_P-001" (hatched Horizontal grid 0 track 8, pour order 14): 6073.8,2629.66 5954.68,2629.66 5946.79,2621.76 5946.79,2550.36 5954.34,2542.81 6001.37,2542.81 6001.37,2545.21 6006.52,2550.36 6006.52,2586.06 6055.93,2586.06 6073.8,2603.94
VCCR_3V3 on Top Layer "NONET_L04_P-001" (hatched Horizontal grid 0 track 8, pour order 20): 6408.06,2744.46 6466.02,2744.46 6470.45,2740.03 6470.45,2567.58 6459.79,2556.93 6406.58,2556.93 6397.12,2566.39 6397.12,2708.61 6406.43,2717.92 6406.43,2746.55
NetL2_1 on Top Layer "NONET_L04_P-001" (hatched Horizontal grid 0 track 8, pour order 13): 6523.25,3219.08 6566.83,3219.08 6571.9,3214.02 6569.67,3211.79 6569.67,3157.67 6523.25,3111.25 6523.25,3077.8 6515.14,3069.69 6489.8,3069.69 6489.8,3079.63 6487.57,3081.86 6487.57,3140.23 6509.47,3162.12 6507.24,3164.35 6507.24,3218.27
NetL3_2 on Top Layer "NONET_L04_P-001" (hatched Horizontal grid 0 track 12, pour order 8): 6293.26,2866.93 6293.52,2866.67 6311.05,2866.67 6311.05,2754.45 6295.09,2738.49 6294.83,2738.76 6241.2,2738.76 6241.2,2801.27 6238.07,2804.41 6238.33,2804.67 6271.81,2804.67 6271.81,2864.05 6272.59,2864.84
VCCR_3V3 on Top Layer "NONET_L04_P-001" (hatched Horizontal grid 0 track 8, pour order 12): 6597.69,3229.86 6593.18,3225.35 6593.18,3143.65 6688.12,3143.65 6688.34,3143.43 6695.54,3150.62 6695.54,3231.25
VCC_3V3 on Top Layer "NONET_L04_P-001" (hatched Horizontal grid 0 track 8, remove dead copper, pour order 1): 5785,2580 5925,2580 5940,2565 5940,2525.49 5934.44,2519.93 5769.25,2519.93 5760,2529.18 5760,2580
VCC_3V3 on PWR "NONET_L04_P-001" (solid, remove dead copper, pour order 16): 5343.22,2447.72 ccw(c5428.01,2447.72) 5401.41,2367.21 cw(c5195.5,2052.43) 5536.59,2211 ccw(c5695.28,2253.52) 5695.28,2089.23 6483.85,2089.23 ccw(c6483.85,2253.52) 6642.54,2211 cw(c6863.72,2156.19) 6777.72,2367.21 ccw(c6751.13,2447.72) 6835.91,2447.72 6835.91,2691.2 ccw(c6793.66,2691.2) 6812.05,2729.24 cw(c6882.14,2807.31) 6777.32,2811.97 6777.32,2839.37 cw(c6882.14,2844.02) 6812.05,2922.1 ccw(c6793.66,2960.13) 6835.91,2960.13 6835.91,3203.62 ccw(c6751.13,3203.62) 6777.72,3284.12 cw(c6863.72,3495.14) 6642.54,3440.34 ccw(c6483.85,3397.82) 6483.85,3562.1 5695.28,3562.1 ccw(c5695.28,3397.82) 5536.59,3440.34 cw(c5315.41,3495.14) 5401.41,3284.12 ccw(c5428.01,3203.62) 5343.22,3203.62 5343.22,2960.13 ccw(c5385.47,2960.13) 5367.08,2922.1 cw(c5296.99,2844.02) 5401.81,2839.37 5401.81,2811.97 cw(c5296.99,2807.31) 5367.08,2729.24 ccw(c5385.48,2691.2) 5343.22,2691.2
VCCR_3V3 on PWR "NONET_L04_P-001" (hatched Horizontal grid 0 track 8, remove dead copper, pour order 10): 6118.01,3263.58 6118.01,2945.64 6030.74,2858.37 5928.47,2858.37 5918.32,2848.22 5920.86,2845.68 5920.86,2723.07 5957.22,2686.71 6528.83,2686.71 6637.07,2794.95 6700.49,2843.66 6700.49,3198.29 6700.49,3252.41 6686.96,3265.94
VSYS on PWR "NONET_L04_P-001" (solid, pour order 0): 6080,2400 6350,2400 6420,2470 6420,2695 6389.8,2725.2 6065.2,2725.2 6025,2685 6025,2485
GND on Bottom Layer "NONET_L04_P-001" (solid, remove dead copper, pour order 7): 5343.22,2447.72 ccw(c5428.01,2447.72) 5401.41,2367.21 cw(c5195.5,2052.43) 5536.59,2211 ccw(c5695.28,2253.52) 5695.28,2089.23 6483.85,2089.23 ccw(c6483.85,2253.52) 6642.54,2211 cw(c6863.72,2156.19) 6777.72,2367.21 ccw(c6751.13,2447.72) 6835.91,2447.72 6835.91,2691.2 ccw(c6793.66,2691.2) 6812.05,2729.24 cw(c6882.14,2807.31) 6777.32,2811.97 6777.32,2839.37 cw(c6882.14,2844.02) 6812.05,2922.1 ccw(c6793.66,2960.13) 6835.91,2960.13 6835.91,3203.62 ccw(c6751.13,3203.62) 6777.72,3284.12 cw(c6863.72,3495.14) 6642.54,3440.34 ccw(c6483.85,3397.82) 6483.85,3562.1 5695.28,3562.1 ccw(c5695.28,3397.82) 5536.59,3440.34 cw(c5315.41,3495.14) 5401.41,3284.12 ccw(c5428.01,3203.62) 5343.22,3203.62 5343.22,2960.13 ccw(c5385.47,2960.13) 5367.08,2922.1 cw(c5296.99,2844.02) 5401.81,2839.37 5401.81,2811.97 cw(c5296.99,2807.31) 5367.08,2729.24 ccw(c5385.48,2691.2) 5343.22,2691.2
GND on GND "NONET_L04_P-001" (hatched Horizontal grid 0 track 8, remove dead copper, pour order 9): 5343.22,2447.72 ccw(c5428.01,2447.72) 5401.41,2367.21 cw(c5195.5,2052.43) 5536.59,2211 ccw(c5695.28,2253.52) 5695.28,2089.23 6483.85,2089.23 ccw(c6483.85,2253.52) 6642.54,2211 cw(c6863.72,2156.19) 6777.72,2367.21 ccw(c6751.13,2447.72) 6835.91,2447.72 6835.91,2691.2 ccw(c6793.66,2691.2) 6812.05,2729.24 cw(c6882.14,2807.31) 6777.32,2811.97 6777.32,2839.37 cw(c6882.14,2844.02) 6812.05,2922.1 ccw(c6793.66,2960.13) 6835.91,2960.13 6835.91,3203.62 ccw(c6751.13,3203.62) 6777.72,3284.12 cw(c6863.72,3495.14) 6642.54,3440.34 ccw(c6483.85,3397.82) 6483.85,3562.1 5695.28,3562.1 ccw(c5695.28,3397.82) 5536.59,3440.34 cw(c5315.41,3495.14) 5401.41,3284.12 ccw(c5428.01,3203.62) 5343.22,3203.62 5343.22,2960.13 ccw(c5385.47,2960.13) 5367.08,2922.1 cw(c5296.99,2844.02) 5401.81,2839.37 5401.81,2811.97 cw(c5296.99,2807.31) 5367.08,2729.24 ccw(c5385.48,2691.2) 5343.22,2691.2

## Keep-outs
GND:
  region: 5490.33,2958.25 5490.33,3110.29 cw(c5505.33,3110.29) 5505.33,3125.29 5627.88,3125.29 cw(c5627.88,3110.29) 5642.88,3110.29 5642.88,2958.25 cw(c5627.88,2958.25) 5627.88,2943.25 5505.33,2943.25 cw(c5505.33,2958.25)

## Other copper
Multi-Layer:
  pour cut-out: 6339.53,3343.64 6339.53,3208.8 6509.91,3208.8 6511.72,3210.62 6509.91,3212.43 6509.91,3342.91

## Silkscreen, mask and mechanical layers (free items; w line width, h text height)
Top Overlay:
  text "CRABIT" at 5967.95,3484.56 h50
  text "X" at 6150,3480 h90
  text "WATCH" at 6000,2125 h45
Mechanical 1:
  lines w0.5: 5695.28,3345.91 cw(c5695.28,3397.82) 5695.28,3449.72 6483.85,3449.72 ; 6492.16,3345.9 ccw(c6492.16,3397.81) 6492.16,3449.71 ; 6777.22,2843.66 cw(c6882.14,2844.02) 6812.05,2922.1 ccw(c6793.66,2960.13) 6835.91,2960.13 6835.91,3203.62 ccw(c6751.13,3203.62) 6777.72,3284.12 cw(c6863.72,3495.14) 6642.54,3440.34 ccw(c6483.85,3397.82) 6483.85,3562.1 5695.28,3562.1 ccw(c5695.28,3397.82) 5536.59,3440.34 cw(c5315.41,3495.14) 5401.41,3284.12 ccw(c5428.01,3203.62) 5343.22,3203.62 5343.22,2960.13 ccw(c5385.48,2960.13) 5367.08,2922.1 cw(c5296.99,2844.02) 5401.81,2839.37 5401.81,2811.97 cw(c5296.99,2807.31) 5367.08,2729.24 ccw(c5385.48,2691.2) 5343.22,2691.2 5343.22,2447.72 ccw(c5428.01,2447.72) 5401.41,2367.21 cw(c5195.5,2052.43) 5536.59,2211 ccw(c5695.28,2253.52) 5695.28,2089.23 6483.85,2089.23 ccw(c6483.85,2253.52) 6642.54,2211 cw(c6863.72,2156.19) 6777.72,2367.21 ccw(c6751.13,2447.72) 6833.37,2427.12 ; 5695.28,2301.97 ccw(c5695.28,2253.52) 5696.29,2205.08 6482.84,2205.08 ccw(c6483.85,2253.52) 6483.85,2301.97 6419.16,2301.97 cw(c6417.86,2318.67) 6401.12,2318.96 ccw(c6374.16,2325.49) 6383.87,2351.47 5795.26,2351.47 ccw(c5804.97,2325.49) 5778.01,2318.96 cw(c5761.27,2318.67) 5759.97,2301.97 5695.28,2301.97
  lines w1: 5695.31,3345.89 6193.91,3345.89 ; 6193.94,3345.91 6233.84,3345.91 6483.85,3345.91 6492.16,3345.9 ; 6483.86,3449.71 6492.16,3449.71 ; 6777.22,2843.66 6734.99,2843.66 ccw(c6734.73,2831.02) 6722.08,2831.29 6722.08,2801.05 6571.22,2801.05 6570.06,2799.89 6570.06,2439.85 6582.78,2427.14 6833.32,2427.14

## Text inside footprints (layer, text, board x,y; h text height)
U14: Top Overlay "DI" at 5740.78,2405.77 h9.84 r270; Top Overlay "DO" at 5774.24,2441.2 h9.84 r270
U16: Top Overlay "DI" at 6439.28,2422.87 h9.84 r90; Top Overlay "DO" at 6405.82,2387.44 h9.84 r90